# Altium PCB XCZU15EG-F V1.0尺寸图.PcbDoc (part 1 of 2)
Units mil, origin at the board's own origin, x right, y up, seen from the top; angles counter-clockwise.
Board outline 7030 x 5980 mil, 2 copper layers (TOP, BOT), stack 10.74 mil thick; 40 components, 760 nets, 1412 pads, 0 vias.
Unrouted connection lines stored in the file: 737.
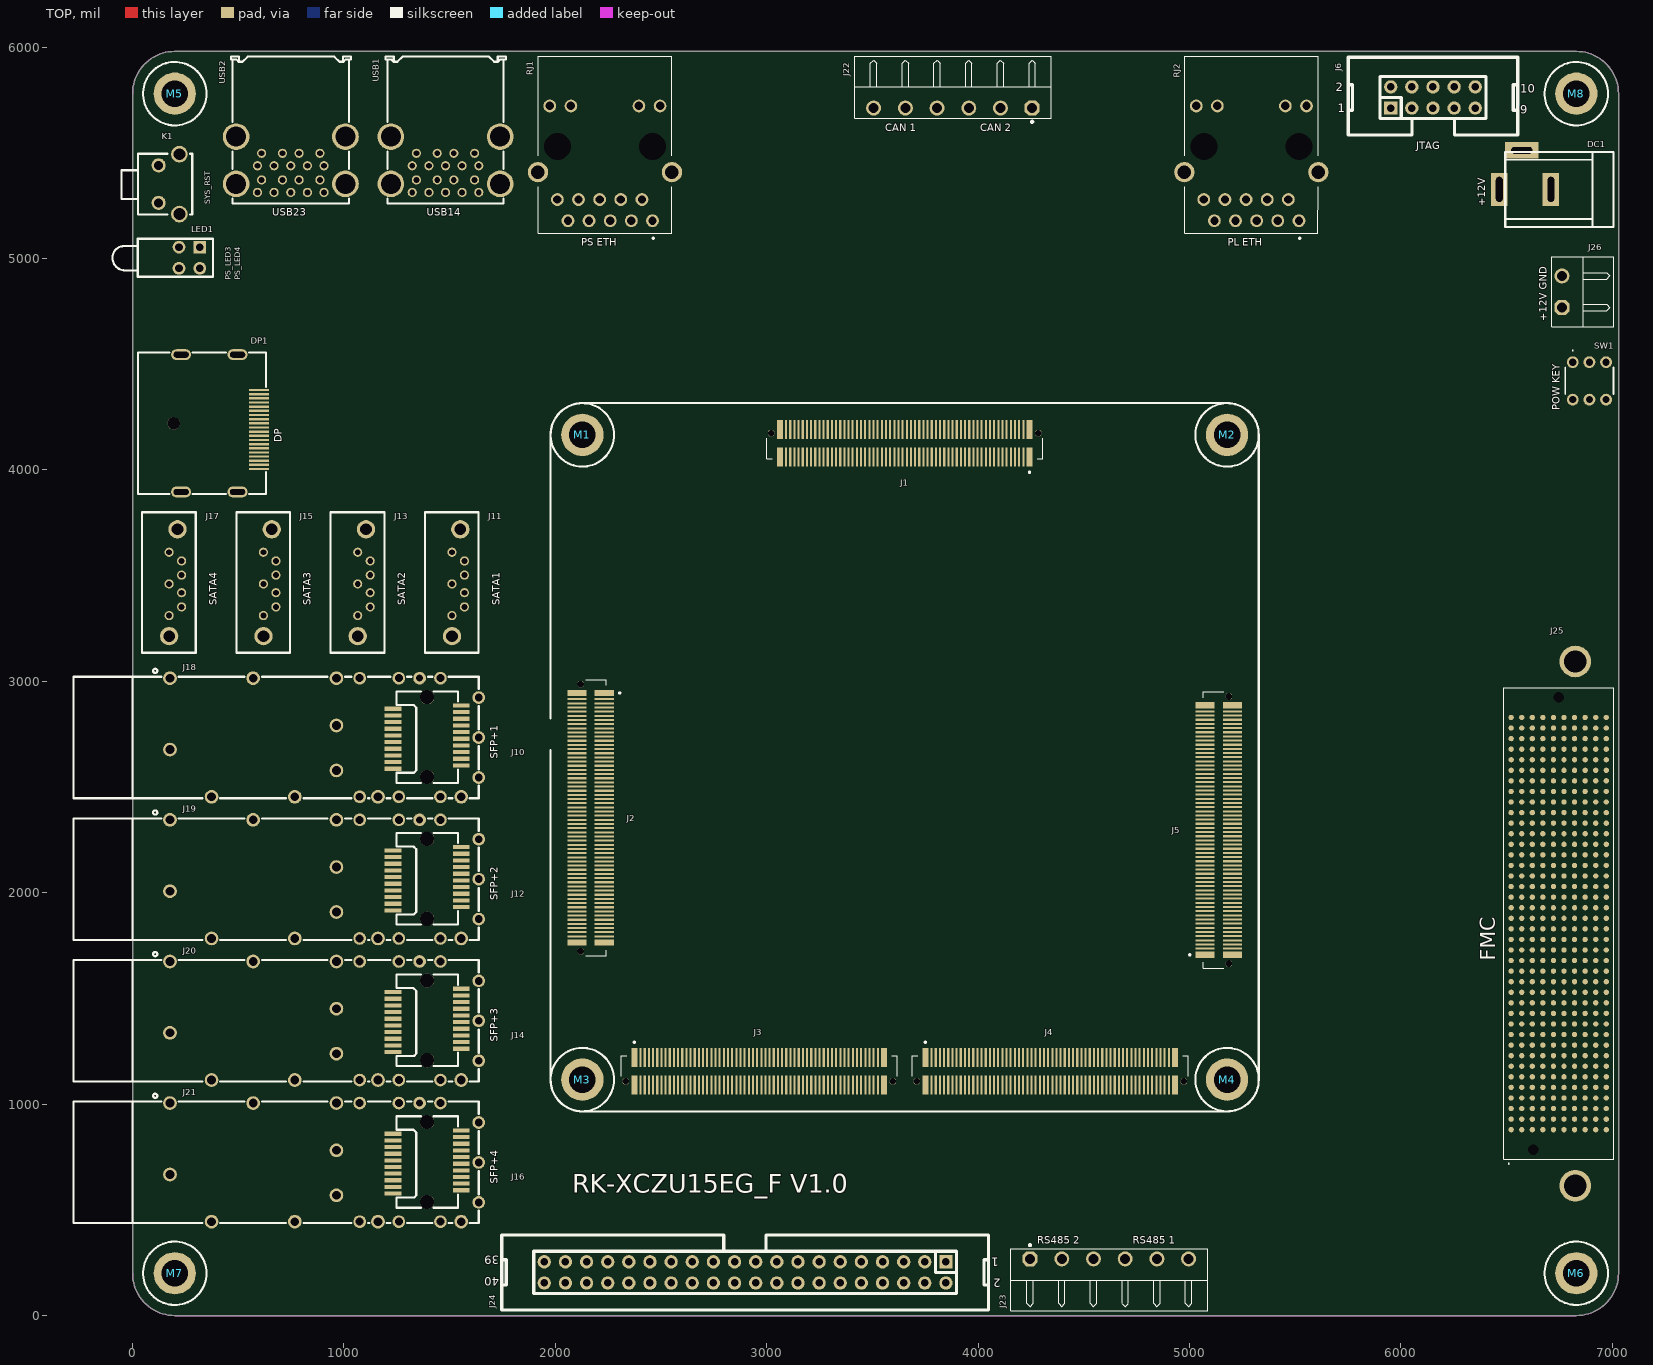
[diagram p0: TOP view]
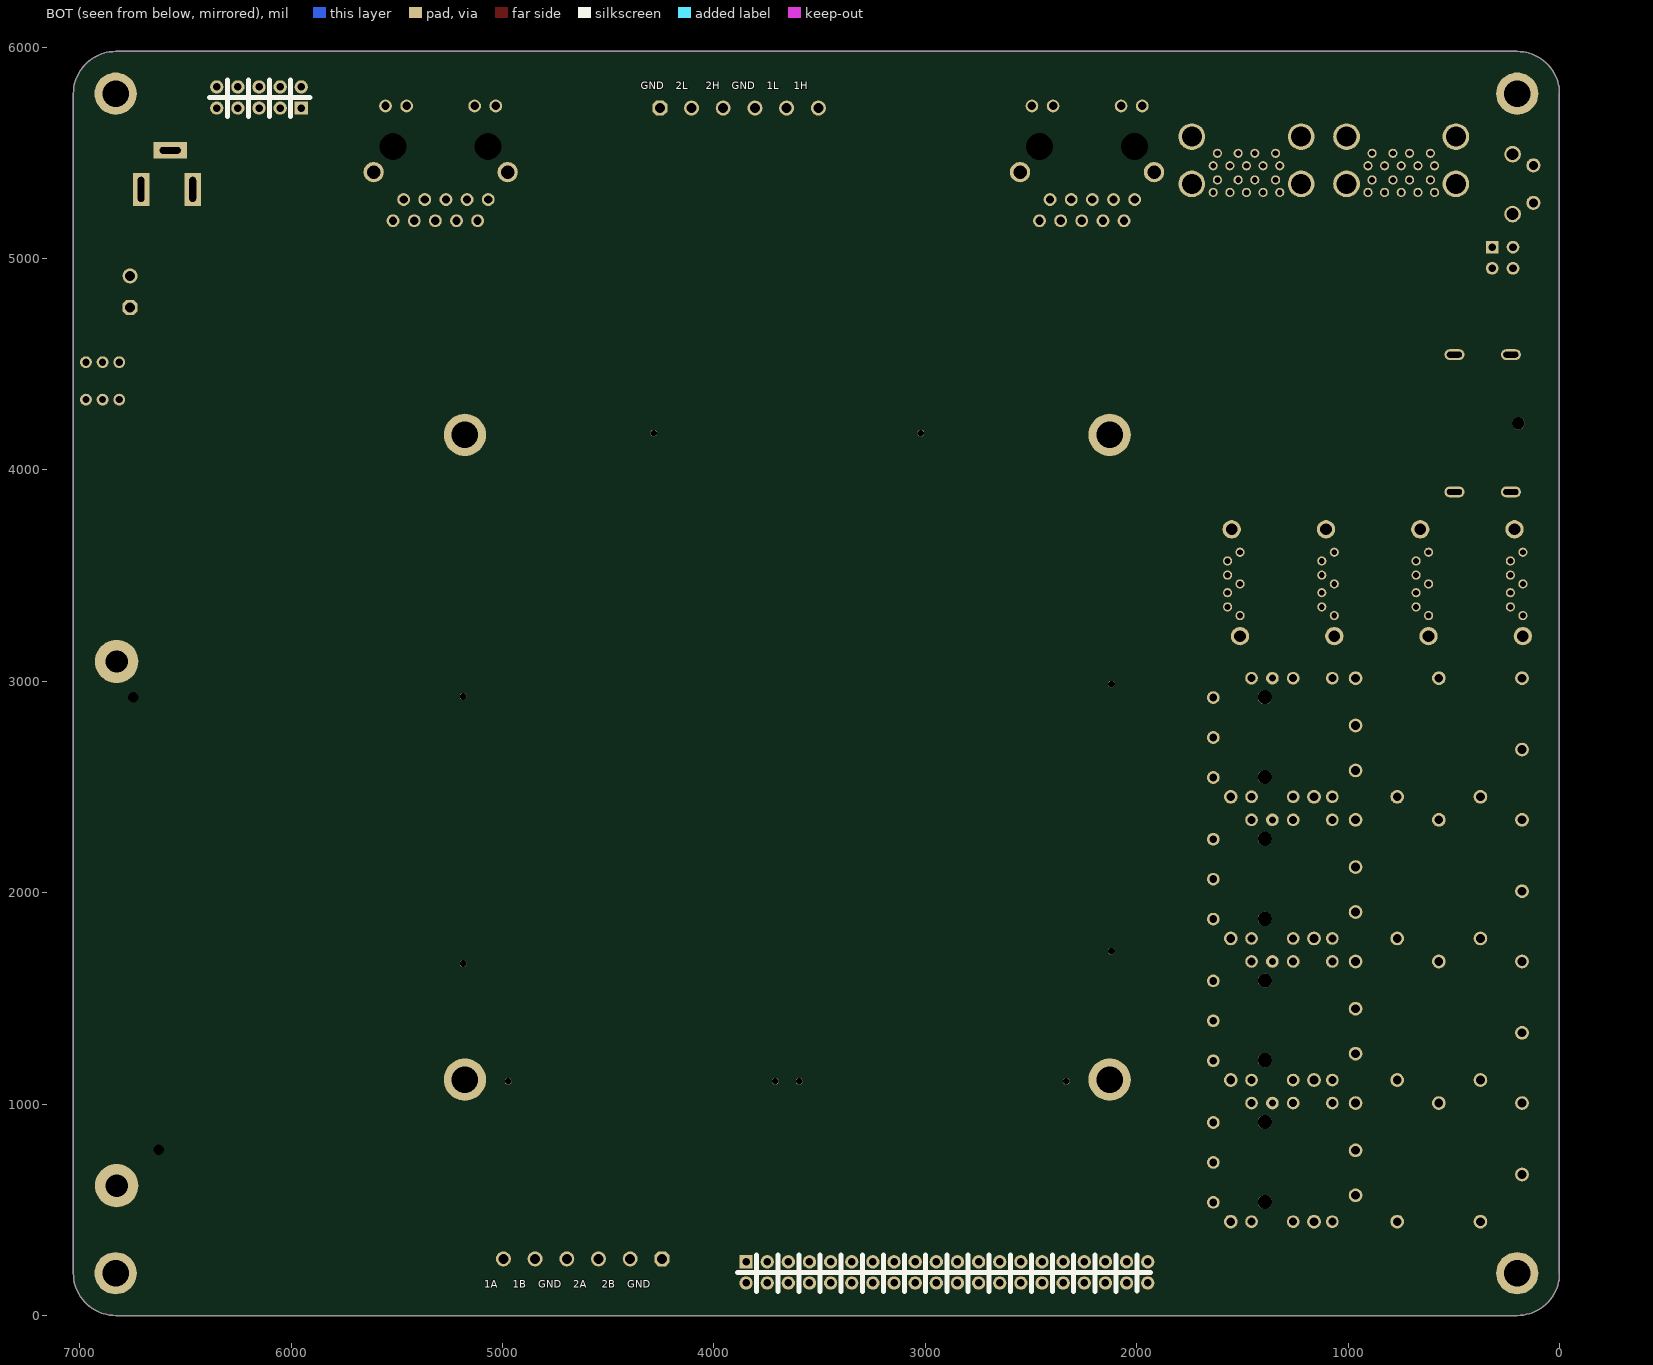
[diagram p1: BOT view, seen from below]

## Layer stack, top to bottom
TOP: signal copper 1.38
Dielectric 2: core 7.98, Dk 4.2
BOT: signal copper 1.38

## Board outline
0,200 ccw(c200,200) 200,0 6830,0 ccw(c6830,200) 7030,200 7030,5780 ccw(c6830,5780) 6830,5980 200,5980 ccw(c200,5780) 0,5780

## Design rules (kind name [scope] priority, off if disabled: settings)
Clearance [All] p1: gap=4 ignorepadtopadclearanceinfootprint=FALSE except(5: Via-Via; 6: Via-Fill Via-Poly Via-Region; 8: THPad-THPad THPad-Via THPad-Text THPad-Hole Via-Text Via-Hole Fill-Fill Fill-Poly Fill-Region Fill-Text Fill-Hole Poly-Poly Poly-Region Poly-Text Poly-Hole Region-Region Region-Text Region-Hole Text-Text Text-Hole; 10: SMDPad-Fill SMDPad-Poly SMDPad-Region THPad-Fill THPad-Poly THPad-Region; 20: Arc-Fill Arc-Poly Arc-Region Track-Fill Track-Poly Track-Region)
ComponentClearance [All] p1 off: gap=10 collisioncheckmode=3 verticalgap=10 showdistances=FALSE
DiffPairsRouting 90R [InNetClass('90R')] p1: maxlimit=4 minlimit=4 mostfreqgap=4 toplayer_minwidth=6.71 toplayer_maxwidth=6.71 toplayer_prefwidth=6.71 bottomlayer_minwidth=6.71 bottomlayer_maxwidth=6.71 bottomlayer_prefwidth=6.71 maxuncoupledlength=50000
DiffPairsRouting [All] p2: maxlimit=4 minlimit=4 mostfreqgap=4 toplayer_minwidth=4.57 toplayer_maxwidth=4.57 toplayer_prefwidth=4.57 bottomlayer_minwidth=4.57 bottomlayer_maxwidth=4.57 bottomlayer_prefwidth=4.57 maxuncoupledlength=50000
HoleSize [All] p1: absolutevalues=TRUE maxlimit=200 minlimit=1 maxpercent=80.000 minpercent=20.000
Length "InNet('DQ1') Or InNet('DQ5')" [InNet('DQ1') Or InNet('DQ5')] p1: maxlimit=1833.85 minlimit=0
MatchedLengths [InNetClass('New Class')] p1: tolerance=0.2 checknetsindiffpair=TRUE checkdiffpairvsdiffpair=FALSE checkxsignals=FALSE checkothers=FALSE
MinimumSolderMaskSliver [All] p1 off: minsoldermaskwidth=10
NetAntennae [All] p1: netantennaetolerance=1
ParallelSegment [All] p1: limit=10000 gap=3.5
PlaneConnect [All] p1: planeconnectstyle=Relief reliefexpansion=20 reliefentries=4 reliefconductorwidth=23.62 reliefairgap=10
PolygonConnect [All] p1: thpad.connectstyle=Relief thpad.reliefconductorwidth=15 thpad.reliefentries=4 thpad.polygonreliefangle="90 Angle" thpad.airgapwidth=8 smdpad.connectstyle=Direct smdpad.reliefconductorwidth=15 smdpad.reliefentries=4 smdpad.polygonreliefangle="90 Angle" smdpad.airgapwidth=8 via.connectstyle=Direct via.reliefconductorwidth=15 via.reliefentries=4 via.polygonreliefangle="90 Angle" via.airgapwidth=8
RoutingVias [All] p1: holewidth=8 width=18 viastyle="Through Hole" minholewidth=8 minwidth=18 maxholewidth=10 maxwidth=20
SilkToBoardRegionClearance [All] p1 off:
SilkToSilkClearance [All] p1: silktosilkclearance=4
SilkToSolderMaskClearance [IsPad] p1: minsilkscreentomaskgap=0 clearancetoexposedcopper=TRUE
SolderMaskExpansion [All] p1: expansion=4 istentingtop=FALSE
UnRoutedNet [All] p1: checkbadconnections=TRUE
Width [All] p1: maxlimit=60 minlimit=5 preferedwidth=5
20 further rules are at their usual default settings.

## Classes and differential pairs
component class "PAGE04 XCZU15EG-F-CON3": J5
component class "PAGE03 XCZU15EG-F-CON2": J3 J4
component class "PAGE02 XCZU15EG-F-CON1": J1 J2
component class "PAGE21 XCZU15EG-F-POW": DC1 J26 SW1
component class "PAGE19 XCZU15EG-F-FMC1": J25
component class "PAGE18 XCZU15EG-F-IO": J24
component class "PAGE17 XCZU15EG-F-CAN&RS485": J22 J23
component class "PAGE14 XCZU15EG-F-SFP&SATA": J10 J11 J12 J13 J14 J15 J16 J17 J18 J19 J20 J21
component class "PAGE12 XCZU15EG-F-USBHUB": USB1 USB2
component class "PAGE09 XCZU15EG-F-DP": DP1
component class "PAGE07 XCZU15EG-F-PLETH": RJ2
component class "PAGE06 XCZU15EG-F-PSETH": RJ1
component class "PAGE05 XCZU15EG-F-JTAG": J6 K1 LED1 M3 M4 M5 M6 M7 M8
differential pair PLL_129_CLK0CC: +PLL_129_CLK0CC_P -PLL_129_CLK0CC_N
differential pair PLL_129_CLK1: +PLL_129_CLK1_P -PLL_129_CLK1_N
differential pair PLL_129_CLK1CC: +PLL_129_CLK1CC_P -PLL_129_CLK1CC_N
differential pair IO17: +IO17_P -IO17_N
differential pair IO16: +IO16_P -IO16_N
differential pair IO15: +IO15_P -IO15_N
differential pair IO14: +IO14_P -IO14_N
differential pair IO13: +IO13_P -IO13_N
differential pair IO12: +IO12_P -IO12_N
differential pair IO11: +IO11_P -IO11_N
differential pair IO10: +IO10_P -IO10_N
differential pair IO9: +IO9_P -IO9_N
differential pair IO8: +IO8_P -IO8_N
differential pair IO7: +IO7_P -IO7_N
differential pair IO6: +IO6_P -IO6_N
differential pair IO5: +IO5_P -IO5_N
differential pair IO4: +IO4_P -IO4_N
differential pair IO3: +IO3_P -IO3_N
differential pair IO2: +IO2_P -IO2_N
differential pair IO1: +IO1_P -IO1_N
differential pair 505_USB_CLKCCCC: +505_USB_CLKCCCC_P -505_USB_CLKCCCC_N
differential pair 129_CLK0: +129_CLK0_P -129_CLK0_N
differential pair FMC_DP5_M2C: +FMC_DP5_M2C_P -FMC_DP5_M2C_N
differential pair FMC_DP4_M2C: +FMC_DP4_M2C_P -FMC_DP4_M2C_N
differential pair FMC_GBTCLK1_M2C: +FMC_GBTCLK1_M2C_P -FMC_GBTCLK1_M2C_N
differential pair FMC_DP7_M2C: +FMC_DP7_M2C_P -FMC_DP7_M2C_N
differential pair FMC_DP7_C2M: +FMC_DP7_C2M_P -FMC_DP7_C2M_N
differential pair FMC_DP6_M2C: +FMC_DP6_M2C_P -FMC_DP6_M2C_N
differential pair FMC_DP6_C2M: +FMC_DP6_C2M_P -FMC_DP6_C2M_N
differential pair FMC_DP5_C2M: +FMC_DP5_C2M_P -FMC_DP5_C2M_N
differential pair FMC_DP4_C2M: +FMC_DP4_C2M_P -FMC_DP4_C2M_N
differential pair PLL_B67_L13: +PLL_B67_L13_P -PLL_B67_L13_N
differential pair PLL_B67_L13CC: +PLL_B67_L13CC_P -PLL_B67_L13CC_N
differential pair FMC_LA13: +FMC_LA13_P -FMC_LA13_N
differential pair 505_DP_CLKCC: +505_DP_CLKCC_P -505_DP_CLKCC_N
differential pair SATA4_TX: +SATA4_TX_P -SATA4_TX_N
differential pair SATA4_RX: +SATA4_RX_P -SATA4_RX_N
differential pair SATA3_TX: +SATA3_TX_P -SATA3_TX_N
differential pair SATA3_RX: +SATA3_RX_P -SATA3_RX_N
differential pair SATA2_TX: +SATA2_TX_P -SATA2_TX_N
differential pair SATA2_RX: +SATA2_RX_P -SATA2_RX_N
differential pair SATA1_TX: +SATA1_TX_P -SATA1_TX_N
differential pair SATA1_RX: +SATA1_RX_P -SATA1_RX_N
differential pair PLL_229_CLK1CC: +PLL_229_CLK1CC_P -PLL_229_CLK1CC_N
differential pair PLL_228_CLK1CC: +PLL_228_CLK1CC_P -PLL_228_CLK1CC_N
differential pair PLL_128_CLK0CC: +PLL_128_CLK0CC_P -PLL_128_CLK0CC_N
differential pair PCIE_REFCLKCC: +PCIE_REFCLKCC_P -PCIE_REFCLKCC_N
differential pair 505_USB_CLKCC: +505_USB_CLKCC_P -505_USB_CLKCC_N
differential pair 505_PCIE_REFCLKCC: +505_PCIE_REFCLKCC_P -505_PCIE_REFCLKCC_N
differential pair PLL_229_CLK1: +PLL_229_CLK1_P -PLL_229_CLK1_N
differential pair PLL_228_CLK1: +PLL_228_CLK1_P -PLL_228_CLK1_N
differential pair PLL_128_CLK0: +PLL_128_CLK0_P -PLL_128_CLK0_N
differential pair 505_USB_CLK: +505_USB_CLK_P -505_USB_CLK_N
differential pair 505_PCIE_REFCLK: +505_PCIE_REFCLK_P -505_PCIE_REFCLK_N
differential pair 505_DP_CLK: +505_DP_CLK_P -505_DP_CLK_N
differential pair FMC_LA33: +FMC_LA33_P -FMC_LA33_N
differential pair FMC_LA32: +FMC_LA32_P -FMC_LA32_N
differential pair FMC_LA31: +FMC_LA31_P -FMC_LA31_N
differential pair FMC_LA30: +FMC_LA30_P -FMC_LA30_N
differential pair FMC_LA29: +FMC_LA29_P -FMC_LA29_N
differential pair FMC_LA28: +FMC_LA28_P -FMC_LA28_N
differential pair FMC_LA27: +FMC_LA27_P -FMC_LA27_N
differential pair FMC_LA26: +FMC_LA26_P -FMC_LA26_N
differential pair FMC_LA25: +FMC_LA25_P -FMC_LA25_N
differential pair FMC_LA24: +FMC_LA24_P -FMC_LA24_N
differential pair FMC_LA23: +FMC_LA23_P -FMC_LA23_N
differential pair FMC_LA22: +FMC_LA22_P -FMC_LA22_N
differential pair FMC_LA21: +FMC_LA21_P -FMC_LA21_N
differential pair FMC_LA20: +FMC_LA20_P -FMC_LA20_N
differential pair FMC_LA19: +FMC_LA19_P -FMC_LA19_N
differential pair FMC_LA18_CC: +FMC_LA18_CC_P -FMC_LA18_CC_N
differential pair FMC_LA17_CC: +FMC_LA17_CC_P -FMC_LA17_CC_N
differential pair FMC_LA16: +FMC_LA16_P -FMC_LA16_N
differential pair FMC_LA15: +FMC_LA15_P -FMC_LA15_N
differential pair FMC_LA14: +FMC_LA14_P -FMC_LA14_N
differential pair FMC_LA12: +FMC_LA12_P -FMC_LA12_N
differential pair FMC_LA11: +FMC_LA11_P -FMC_LA11_N
differential pair FMC_LA10: +FMC_LA10_P -FMC_LA10_N
differential pair FMC_LA09: +FMC_LA09_P -FMC_LA09_N
differential pair FMC_LA08: +FMC_LA08_P -FMC_LA08_N
differential pair FMC_LA07: +FMC_LA07_P -FMC_LA07_N
differential pair FMC_LA06: +FMC_LA06_P -FMC_LA06_N
differential pair FMC_LA05: +FMC_LA05_P -FMC_LA05_N
differential pair FMC_LA04: +FMC_LA04_P -FMC_LA04_N
differential pair FMC_LA03: +FMC_LA03_P -FMC_LA03_N
differential pair FMC_LA02: +FMC_LA02_P -FMC_LA02_N
differential pair FMC_LA01_CC: +FMC_LA01_CC_P -FMC_LA01_CC_N
differential pair FMC_LA00_CC: +FMC_LA00_CC_P -FMC_LA00_CC_N
differential pair FMC_CLK1: +FMC_CLK1_P -FMC_CLK1_N
differential pair FMC_CLK0: +FMC_CLK0_P -FMC_CLK0_N
differential pair FMC_GBTCLK0_M2C: +FMC_GBTCLK0_M2C_P -FMC_GBTCLK0_M2C_N
differential pair FMC_DP0_M2C: +FMC_DP0_M2C_P -FMC_DP0_M2C_N
differential pair FMC_DP0_C2M: +FMC_DP0_C2M_P -FMC_DP0_C2M_N
differential pair FMC_DP3_M2C: +FMC_DP3_M2C_P -FMC_DP3_M2C_N
differential pair FMC_DP3_C2M: +FMC_DP3_C2M_P -FMC_DP3_C2M_N
differential pair FMC_DP2_M2C: +FMC_DP2_M2C_P -FMC_DP2_M2C_N
differential pair FMC_DP2_C2M: +FMC_DP2_C2M_P -FMC_DP2_C2M_N
differential pair FMC_DP1_M2C: +FMC_DP1_M2C_P -FMC_DP1_M2C_N
differential pair FMC_DP1_C2M: +FMC_DP1_C2M_P -FMC_DP1_C2M_N
differential pair SFP2_TX: +SFP2_TX_P -SFP2_TX_N
differential pair SFP2_RX: +SFP2_RX_P -SFP2_RX_N
differential pair SFP1_TX: +SFP1_TX_P -SFP1_TX_N
differential pair SFP1_RX: +SFP1_RX_P -SFP1_RX_N
differential pair SFP4_RX: +SFP4_RX_P -SFP4_RX_N
differential pair SFP4_TX: +SFP4_TX_P -SFP4_TX_N
differential pair PHY2_MDI3: +PHY2_MDI3_P -PHY2_MDI3_N
differential pair PHY2_MDI2: +PHY2_MDI2_P -PHY2_MDI2_N
differential pair PHY2_MDI1: +PHY2_MDI1_P -PHY2_MDI1_N
differential pair PHY2_MDI0: +PHY2_MDI0_P -PHY2_MDI0_N
differential pair PHY1_MDI3: +PHY1_MDI3_P -PHY1_MDI3_N
differential pair PHY1_MDI2: +PHY1_MDI2_P -PHY1_MDI2_N
differential pair PHY1_MDI1: +PHY1_MDI1_P -PHY1_MDI1_N
differential pair PHY1_MDI0: +PHY1_MDI0_P -PHY1_MDI0_N
differential pair USB_TX: +USB_TX_P -USB_TX_N
differential pair USB_RX: +USB_RX_P -USB_RX_N
differential pair SFP3_TX: +SFP3_TX_P -SFP3_TX_N
differential pair SFP3_RX: +SFP3_RX_P -SFP3_RX_N
differential pair PCIE_TX: +PCIE_TX_P -PCIE_TX_N
differential pair MIPI1_LAN1: +MIPI1_LAN1_P -MIPI1_LAN1_N
differential pair MIPI1_LAN0: +MIPI1_LAN0_P -MIPI1_LAN0_N
differential pair MIPI1_CLK: +MIPI1_CLK_P -MIPI1_CLK_N
differential pair GT1_DP_TX: +GT1_DP_TX_P -GT1_DP_TX_N
differential pair GT0_DP_TX: +GT0_DP_TX_P -GT0_DP_TX_N
differential pair DPAUX: +DPAUX_P -DPAUX_N
differential pair SATA4_TX_C: +SATA4_TX_C_P -SATA4_TX_C_N
differential pair SATA4_RX_C: +SATA4_RX_C_P -SATA4_RX_C_N
differential pair SATA3_TX_C: +SATA3_TX_C_P -SATA3_TX_C_N
differential pair SATA3_RX_C: +SATA3_RX_C_P -SATA3_RX_C_N
differential pair PCIE_RX_C: +PCIE_RX_C_P -PCIE_RX_C_N
differential pair TX_DS4_C: +TX_DS4_C_P -TX_DS4_C_N
differential pair PCIE_TX_C: +PCIE_TX_C_P -PCIE_TX_C_N
differential pair USB_4: +USB_4_P -USB_4_N
differential pair USB_3: +USB_3_P -USB_3_N
differential pair USB_2: +USB_2_P -USB_2_N
differential pair USB_1: +USB_1_P -USB_1_N
differential pair TX_DS3_C: +TX_DS3_C_P -TX_DS3_C_N
differential pair TX_DS2_C: +TX_DS2_C_P -TX_DS2_C_N
differential pair TX_DS1_C: +TX_DS1_C_P -TX_DS1_C_N
differential pair SATA2_TX_C: +SATA2_TX_C_P -SATA2_TX_C_N
differential pair SATA2_RX_C: +SATA2_RX_C_P -SATA2_RX_C_N
differential pair SATA1_TX_C: +SATA1_TX_C_P -SATA1_TX_C_N
differential pair SATA1_RX_C: +SATA1_RX_C_P -SATA1_RX_C_N
differential pair GT1_DP_TX_C: +GT1_DP_TX_C_P -GT1_DP_TX_C_N
differential pair GT0_DP_TX_C: +GT0_DP_TX_C_P -GT0_DP_TX_C_N
differential pair DPAUX_C: +DPAUX_C_P -DPAUX_C_N
differential pair USB_TXUP: +USB_TXUP_P -USB_TXUP_N
differential pair USB_RXUP: +USB_RXUP_P -USB_RXUP_N
differential pair TX_DS4: +TX_DS4_P -TX_DS4_N
differential pair TX_DS3: +TX_DS3_P -TX_DS3_N
differential pair TX_DS2: +TX_DS2_P -TX_DS2_N
differential pair TX_DS1: +TX_DS1_P -TX_DS1_N
differential pair RX_DS4: +RX_DS4_P -RX_DS4_N
differential pair RX_DS3: +RX_DS3_P -RX_DS3_N
differential pair RX_DS2: +RX_DS2_P -RX_DS2_N
differential pair RX_DS1: +RX_DS1_P -RX_DS1_N
differential pair PCIE_REFCLK: +PCIE_REFCLK_P -PCIE_REFCLK_N
differential pair D01: +D01_P -D01_N

## Components (designator, comment, footprint, x,y, rotation, side; value= is the part's Value field where it differs from the comment)
DC1 "DC-005-5A-2.5" DC-005 6709.8,5326.96 r0 top locked
DP1 "HYC16-DP20-178" DP-SMD_HYC16-DP20-178 414.64,4220.8 r270 top locked
J1 "AXK6A2337YG" AXK6A2337YG 3653,4127.04 r180 top locked
J2 "AXK6A2337YG" AXK6A2337YG 2166.96,2354.72 r270 top locked
J3 "AXK6A2337YG" AXK6A2337YG 2964.72,1154.96 r0 top locked
J4 "AXK6A2337YG" AXK6A2337YG 4341.28,1154.96 r0 top locked
J5 "AXK6A2337YG" AXK6A2337YG 5139.04,2296.72 r90 top locked
J6 "Pin HDR2X5" IDC2.54-LI-2x5P 5952,5712 r0 top locked
J10 "1367073-1" SFP-SMD_1367073-1 1393.69,2736.26 r270 top locked
J11 "Pin HDR1X9" CONN-TH_LE18077-Z54D-4H 1540.86,3466.61 r270 top locked
J12 "1367073-1" SFP-SMD_1367073-1 1393.69,2066.26 r270 top locked
J13 "Pin HDR1X9" CONN-TH_LE18077-Z54D-4H 1094.86,3466.61 r270 top locked
J14 "1367073-1" SFP-SMD_1367073-1 1393.69,1396.26 r270 top locked
J15 "Pin HDR1X9" CONN-TH_LE18077-Z54D-4H 648.86,3466.61 r270 top locked
J16 "1367073-1" SFP-SMD_1367073-1 1393.69,726.26 r270 top locked
J17 "Pin HDR1X9" CONN-TH_LE18077-Z54D-4H 202.86,3466.61 r270 top locked
J18 "HC-SFP-01L" TH_HC-SFP-01L 907.46,2734.51 r0 top locked
J19 "HC-SFP-01L" TH_HC-SFP-01L 907.46,2064.51 r0 top locked
J20 "HC-SFP-01L" TH_HC-SFP-01L 907.46,1394.51 r0 top locked
J21 "HC-SFP-01L" TH_HC-SFP-01L 907.46,724.51 r0 top locked
J22 "KF2EDGR-Y-3.81-6P-1G" ECH381R-06P 3881,5712 r180 top locked
J23 "KF2EDGR-Y-3.81-6P-1G" ECH381R-06P 4621,268.07 r0 top locked
J24 "Pin HDR2X20" IDC2.54-LI-2x20P 3848,254 r180 top locked
J25 "ASP_134486_01" ASP13448601 6746.8,1842.59 r270 top locked
J26 "KF2EDGR-Y-3.81-2P-1G" ECH381R-02P 6762,4843 r90 top locked
K1 "1825027-5" KEY-TH_4P-L7.5-W6.8-P4.50-LS7.2 172.79,5352.27 r270 top locked
LED1 "MHK2396EGBTD" LED-TH_4P-L11.8-W4.3-P2.54 269.22,5004 r270 top locked
M1 "Test" M3x4_L 2128,4166 r0 top
M2 "Test" M3x4_L 5178,4166 r0 top
M3 "Test" M3x4_L 2128,1116 r0 top locked
M4 "Test" M3x4_L 5178,1116 r0 top locked
M5 "Test" M3x4_L 200,5780 r0 top locked
M6 "Test" M3x4_L 6830,200 r0 top locked
M7 "Test" M3x4_L 200,200 r0 top locked
M8 "Test" M3x4_L 6830,5780 r0 top locked
RJ1 "HR911130A" HR911130A 2234.83,5525.31 r0 top locked
RJ2 "HR911130A" HR911130A 5292.83,5525.31 r0 top locked
SW1 "XKB5858-Z" XKB5858Z 6813.26,4510 r180 top locked
USB1 "USB-303WSD-BRY" USB-A-TH_XUNPU_USB-303WSD-BRY 1480.67,5444.85 r180 top locked
USB2 "USB-303WSD-BRY" USB-A-TH_XUNPU_USB-303WSD-BRY 748.67,5444.85 r180 top locked

## Footprints (in the part's own frame and the unit in brackets; to place one, negate y for a bottom-side part, rotate by r counter-clockwise, add the part's x,y. Pads: shape width x height; smd on the part's side, far side on the other; paste and mask are expansions set on the pad)
ASP13448601 [mm]
  round 0.64 smd: A1(24.47,-5.715) A2(23.2,-5.715) A3(21.93,-5.715) A4(20.66,-5.715) A5(19.39,-5.715) A6(18.12,-5.715) A7(16.85,-5.715) A8(15.58,-5.715) A9(14.31,-5.715) A10(13.04,-5.715) A11(11.77,-5.715) A12(10.5,-5.715) A13(9.23,-5.715) A14(7.96,-5.715) A15(6.69,-5.715) A16(5.42,-5.715) A17(4.15,-5.715) A18(2.88,-5.715) A19(1.61,-5.715) A20(0.34,-5.715) A21(-0.93,-5.715) A22(-2.2,-5.715) A23(-3.47,-5.715) A24(-4.74,-5.715) A25(-6.01,-5.715) A26(-7.28,-5.715) A27(-8.55,-5.715) A28(-9.82,-5.715) A29(-11.09,-5.715) A30(-12.36,-5.715) A31(-13.63,-5.715) A32(-14.9,-5.715) A33(-16.17,-5.715) A34(-17.44,-5.715) A35(-18.71,-5.715) A36(-19.98,-5.715) A37(-21.25,-5.715) A38(-22.52,-5.715) A39(-23.79,-5.715) A40(-25.06,-5.715) B1(24.47,-4.445) B2(23.2,-4.445) B3(21.93,-4.445) B4(20.66,-4.445) B5(19.39,-4.445) B6(18.12,-4.445) B7(16.85,-4.445) B8(15.58,-4.445) B9(14.31,-4.445) B10(13.04,-4.445) B11(11.77,-4.445) B12(10.5,-4.445) B13(9.23,-4.445) B14(7.96,-4.445) B15(6.69,-4.445) B16(5.42,-4.445) B17(4.15,-4.445) B18(2.88,-4.445) B19(1.61,-4.445) B20(0.34,-4.445) B21(-0.93,-4.445) B22(-2.2,-4.445) B23(-3.47,-4.445) B24(-4.74,-4.445) B25(-6.01,-4.445) B26(-7.28,-4.445) B27(-8.55,-4.445) B28(-9.82,-4.445) B29(-11.09,-4.445) B30(-12.36,-4.445) B31(-13.63,-4.445) B32(-14.9,-4.445) B33(-16.17,-4.445) B34(-17.44,-4.445) B35(-18.71,-4.445) B36(-19.98,-4.445) B37(-21.25,-4.445) B38(-22.52,-4.445) B39(-23.79,-4.445) B40(-25.06,-4.445) C1(24.47,-3.175) C2(23.2,-3.175) C3(21.93,-3.175) C4(20.66,-3.175) C5(19.39,-3.175) C6(18.12,-3.175) C7(16.85,-3.175) C8(15.58,-3.175) C9(14.31,-3.175) C10(13.04,-3.175) C11(11.77,-3.175) C12(10.5,-3.175) C13(9.23,-3.175) C14(7.96,-3.175) C15(6.69,-3.175) C16(5.42,-3.175) C17(4.15,-3.175) C18(2.88,-3.175) C19(1.61,-3.175) C20(0.34,-3.175) C21(-0.93,-3.175) C22(-2.2,-3.175) C23(-3.47,-3.175) C24(-4.74,-3.175) C25(-6.01,-3.175) C26(-7.28,-3.175) C27(-8.55,-3.175) C28(-9.82,-3.175) C29(-11.09,-3.175) C30(-12.36,-3.175) C31(-13.63,-3.175) C32(-14.9,-3.175) C33(-16.17,-3.175) C34(-17.44,-3.175) C35(-18.71,-3.175) C36(-19.98,-3.175) C37(-21.25,-3.175) C38(-22.52,-3.175) C39(-23.79,-3.175) C40(-25.06,-3.175) D1(24.47,-1.905) D2(23.2,-1.905) D3(21.93,-1.905) D4(20.66,-1.905) D5(19.39,-1.905) D6(18.12,-1.905) D7(16.85,-1.905) D8(15.58,-1.905) D9(14.31,-1.905) D10(13.04,-1.905) D11(11.77,-1.905) D12(10.5,-1.905) D13(9.23,-1.905) D14(7.96,-1.905) D15(6.69,-1.905) D16(5.42,-1.905) D17(4.15,-1.905) D18(2.88,-1.905) D19(1.61,-1.905) D20(0.34,-1.905) D21(-0.93,-1.905) D22(-2.2,-1.905) D23(-3.47,-1.905) D24(-4.74,-1.905) D25(-6.01,-1.905) D26(-7.28,-1.905) D27(-8.55,-1.905) D28(-9.82,-1.905) D29(-11.09,-1.905) D30(-12.36,-1.905) D31(-13.63,-1.905) D32(-14.9,-1.905) D33(-16.17,-1.905) D34(-17.44,-1.905) D35(-18.71,-1.905) D36(-19.98,-1.905) D37(-21.25,-1.905) D38(-22.52,-1.905) D39(-23.79,-1.905) D40(-25.06,-1.905) E1(24.47,-0.635) E2(23.2,-0.635) E3(21.93,-0.635) E4(20.66,-0.635) E5(19.39,-0.635) E6(18.12,-0.635) E7(16.85,-0.635) E8(15.58,-0.635) E9(14.31,-0.635) E10(13.04,-0.635) E11(11.77,-0.635) E12(10.5,-0.635) E13(9.23,-0.635) E14(7.96,-0.635) E15(6.69,-0.635) E16(5.42,-0.635) E17(4.15,-0.635) E18(2.88,-0.635) E19(1.61,-0.635) E20(0.34,-0.635) E21(-0.93,-0.635) E22(-2.2,-0.635) E23(-3.47,-0.635) E24(-4.74,-0.635) E25(-6.01,-0.635) E26(-7.28,-0.635) E27(-8.55,-0.635) E28(-9.82,-0.635) E29(-11.09,-0.635) E30(-12.36,-0.635) E31(-13.63,-0.635) E32(-14.9,-0.635) E33(-16.17,-0.635) E34(-17.44,-0.635) E35(-18.71,-0.635) E36(-19.98,-0.635) E37(-21.25,-0.635) E38(-22.52,-0.635) E39(-23.79,-0.635) E40(-25.06,-0.635) F1(24.47,0.635) F2(23.2,0.635) F3(21.93,0.635) F4(20.66,0.635) F5(19.39,0.635) F6(18.12,0.635) F7(16.85,0.635) F8(15.58,0.635) F9(14.31,0.635) F10(13.04,0.635) F11(11.77,0.635) F12(10.5,0.635) F13(9.23,0.635) F14(7.96,0.635) F15(6.69,0.635) F16(5.42,0.635) F17(4.15,0.635) F18(2.88,0.635) F19(1.61,0.635) F20(0.34,0.635) F21(-0.93,0.635) F22(-2.2,0.635) F23(-3.47,0.635) F24(-4.74,0.635) F25(-6.01,0.635) F26(-7.28,0.635) F27(-8.55,0.635) F28(-9.82,0.635) F29(-11.09,0.635) F30(-12.36,0.635) F31(-13.63,0.635) F32(-14.9,0.635) F33(-16.17,0.635) F34(-17.44,0.635) F35(-18.71,0.635) F36(-19.98,0.635) F37(-21.25,0.635) F38(-22.52,0.635) F39(-23.79,0.635) F40(-25.06,0.635) G1(24.47,1.905) G2(23.2,1.905) G3(21.93,1.905) G4(20.66,1.905) G5(19.39,1.905) G6(18.12,1.905) G7(16.85,1.905) G8(15.58,1.905) G9(14.31,1.905) G10(13.04,1.905) G11(11.77,1.905) G12(10.5,1.905) G13(9.23,1.905) G14(7.96,1.905) G15(6.69,1.905) G16(5.42,1.905) G17(4.15,1.905) G18(2.88,1.905) G19(1.61,1.905) G20(0.34,1.905) G21(-0.93,1.905) G22(-2.2,1.905) G23(-3.47,1.905) G24(-4.74,1.905) G25(-6.01,1.905) G26(-7.28,1.905) G27(-8.55,1.905) G28(-9.82,1.905) G29(-11.09,1.905) G30(-12.36,1.905) G31(-13.63,1.905) G32(-14.9,1.905) G33(-16.17,1.905) G34(-17.44,1.905) G35(-18.71,1.905) G36(-19.98,1.905) G37(-21.25,1.905) G38(-22.52,1.905) G39(-23.79,1.905) G40(-25.06,1.905) H1(24.47,3.175) H2(23.2,3.175) H3(21.93,3.175) H4(20.66,3.175) H5(19.39,3.175) H6(18.12,3.175) H7(16.85,3.175) H8(15.58,3.175) H9(14.31,3.175) H10(13.04,3.175) H11(11.77,3.175) H12(10.5,3.175) H13(9.23,3.175) H14(7.96,3.175) H15(6.69,3.175) H16(5.42,3.175) H17(4.15,3.175) H18(2.88,3.175) H19(1.61,3.175) H20(0.34,3.175) H21(-0.93,3.175) H22(-2.2,3.175) H23(-3.47,3.175) H24(-4.74,3.175) H25(-6.01,3.175) H26(-7.28,3.175) H27(-8.55,3.175) H28(-9.82,3.175) H29(-11.09,3.175) H30(-12.36,3.175) H31(-13.63,3.175) H32(-14.9,3.175) H33(-16.17,3.175) H34(-17.44,3.175) H35(-18.71,3.175) H36(-19.98,3.175) H37(-21.25,3.175) H38(-22.52,3.175) H39(-23.79,3.175) H40(-25.06,3.175) J1(24.47,4.445) J2(23.2,4.445) J3(21.93,4.445) J4(20.66,4.445) J5(19.39,4.445) J6(18.12,4.445) J7(16.85,4.445) J8(15.58,4.445) J9(14.31,4.445) J10(13.04,4.445) J11(11.77,4.445) J12(10.5,4.445) J13(9.23,4.445) J14(7.96,4.445) J15(6.69,4.445) J16(5.42,4.445) J17(4.15,4.445) J18(2.88,4.445) J19(1.61,4.445) J20(0.34,4.445) J21(-0.93,4.445) J22(-2.2,4.445) J23(-3.47,4.445) J24(-4.74,4.445) J25(-6.01,4.445) J26(-7.28,4.445) J27(-8.55,4.445) J28(-9.82,4.445) J29(-11.09,4.445) J30(-12.36,4.445) J31(-13.63,4.445) J32(-14.9,4.445) J33(-16.17,4.445) J34(-17.44,4.445) J35(-18.71,4.445) J36(-19.98,4.445) J37(-21.25,4.445) J38(-22.52,4.445) J39(-23.79,4.445) J40(-25.06,4.445) K1(24.47,5.715) K2(23.2,5.715) K3(21.93,5.715) K4(20.66,5.715) K5(19.39,5.715) K6(18.12,5.715) K7(16.85,5.715) K8(15.58,5.715) K9(14.31,5.715) K10(13.04,5.715) K11(11.77,5.715) K12(10.5,5.715) K13(9.23,5.715) K14(7.96,5.715) K15(6.69,5.715) K16(5.42,5.715) K17(4.15,5.715) K18(2.88,5.715) K19(1.61,5.715) K20(0.34,5.715) K21(-0.93,5.715) K22(-2.2,5.715) K23(-3.47,5.715) K24(-4.74,5.715) K25(-6.01,5.715) K26(-7.28,5.715) K27(-8.55,5.715) K28(-9.82,5.715) K29(-11.09,5.715) K30(-12.36,5.715) K31(-13.63,5.715) K32(-14.9,5.715) K33(-16.17,5.715) K34(-17.44,5.715) K35(-18.71,5.715) K36(-19.98,5.715) K37(-21.25,5.715) K38(-22.52,5.715) K39(-23.79,5.715) K40(-25.06,5.715)
  round 0.635 hole 1.27 unplated: MH1(26.895,-3.05) MH2(-27.485,0)
  round 3.81 / inner round 3.302 / far side round 5.2 hole 2.692: S1(-31.786,2.002) S2(31.196,2.002)
  silkscreen extent -28.6,-6.62 28.6,6.62, body extent -29.02,-6.62 28.44,6.62, height 5.75
AXK6A2337YG [mm]
  rect 0.75x2.3 smd paste-2: 1(-15,1.65) 2(-15,-1.65) 119(15,1.65) 120(15,-1.65)
  rect 0.25x2.3 smd paste-2: 3(-14.25,1.65) 4(-14.25,-1.65) 5(-13.75,1.65) 6(-13.75,-1.65) 7(-13.25,1.65) 8(-13.25,-1.65) 9(-12.75,1.65) 10(-12.75,-1.65) 11(-12.25,1.65) 12(-12.25,-1.65) 13(-11.75,1.65) 14(-11.75,-1.65) 15(-11.25,1.65) 16(-11.25,-1.65) 17(-10.75,1.65) 18(-10.75,-1.65) 19(-10.25,1.65) 20(-10.25,-1.65) 21(-9.75,1.65) 22(-9.75,-1.65) 23(-9.25,1.65) 24(-9.25,-1.65) 25(-8.75,1.65) 26(-8.75,-1.65) 27(-8.25,1.65) 28(-8.25,-1.65) 29(-7.75,1.65) 30(-7.75,-1.65) 31(-7.25,1.65) 32(-7.25,-1.65) 33(-6.75,1.65) 34(-6.75,-1.65) 35(-6.25,1.65) 36(-6.25,-1.65) 37(-5.75,1.65) 38(-5.75,-1.65) 39(-5.25,1.65) 40(-5.25,-1.65) 41(-4.75,1.65) 42(-4.75,-1.65) 43(-4.25,1.65) 44(-4.25,-1.65) 45(-3.75,1.65) 46(-3.75,-1.65) 47(-3.25,1.65) 48(-3.25,-1.65) 49(-2.75,1.65) 50(-2.75,-1.65) 51(-2.25,1.65) 52(-2.25,-1.65) 53(-1.75,1.65) 54(-1.75,-1.65) 55(-1.25,1.65) 56(-1.25,-1.65) 57(-0.75,1.65) 58(-0.75,-1.65) 59(-0.25,1.65) 60(-0.25,-1.65) 61(0.25,1.65) 62(0.25,-1.65) 63(0.75,1.65) 64(0.75,-1.65) 65(1.25,1.65) 66(1.25,-1.65) 67(1.75,1.65) 68(1.75,-1.65) 69(2.25,1.65) 70(2.25,-1.65) 71(2.75,1.65) 72(2.75,-1.65) 73(3.25,1.65) 74(3.25,-1.65) 75(3.75,1.65) 76(3.75,-1.65) 77(4.25,1.65) 78(4.25,-1.65) 79(4.75,1.65) 80(4.75,-1.65) 81(5.25,1.65) 82(5.25,-1.65) 83(5.75,1.65) 84(5.75,-1.65) 85(6.25,1.65) 86(6.25,-1.65) 87(6.75,1.65) 88(6.75,-1.65) 89(7.25,1.65) 90(7.25,-1.65) 91(7.75,1.65) 92(7.75,-1.65) 93(8.25,1.65) 94(8.25,-1.65) 95(8.75,1.65) 96(8.75,-1.65) 97(9.25,1.65) 98(9.25,-1.65) 99(9.75,1.65) 100(9.75,-1.65) 101(10.25,1.65) 102(10.25,-1.65) 103(10.75,1.65) 104(10.75,-1.65) 105(11.25,1.65) 106(11.25,-1.65) 107(11.75,1.65) 108(11.75,-1.65) 109(12.25,1.65) 110(12.25,-1.65) 111(12.75,1.65) 112(12.75,-1.65) 113(13.25,1.65) 114(13.25,-1.65) 115(13.75,1.65) 116(13.75,-1.65) 117(14.25,1.65) 118(14.25,-1.65)
  round 0.81 hole 0.81 unplated: ""(-16.05,-1.2) ""(16.05,-1.2)
  silkscreen extent -16.6,-0.6 16.6,3.6, body extent -16.6,-2.3 16.6,2.3, height 2.4
CONN-TH_LE18077-Z54D-4H [mm]
  round 1.1 hole 0.7 paste+0 mask+0.05: 1(3.955,-0.75) 2(2.9,0.75) 3(1.2,0.75) 4(0.145,-0.75) 5(-0.91,0.75) 6(-2.61,0.75) 7(-3.665,-0.75)
  round 2.2 hole 1.4 paste+0 mask+0.05: 8(-6.415,0.25) 9(6.415,-0.75)
  silkscreen extent -8.46,-4 8.42,2.45
DC-005 [mm] "5.5*2.1mm，DC30V,2.5A"
  rect 2x4 hole 0.8 slot 3 at 90 deg: 1(-6.2,0) 2(0,0)
  rect 4x2 hole 0.8 slot 2.5 at 0 deg: 3(-3.5,4.7)
  silkscreen extent -5.48,-4.5 7.5,4.5, body extent -6.55,-4.5 7.5,4.8, height 11.2
DP-SMD_HYC16-DP20-178 [mm]
  round 1.5 hole 1.5 unplated: 0(0,-5.59)
  rect 0.28x2.4 smd paste-100 mask+0.051: 1(5.5,4.69) 2(5,4.69) 3(4.5,4.69) 4(4,4.69) 5(3.5,4.69) 6(3,4.69) 7(2.5,4.69) 8(2,4.69) 9(1.5,4.69) 10(1,4.69) 11(0.5,4.69) 12(0,4.69) 13(-0.5,4.69) 14(-1,4.69) 15(-1.5,4.69) 16(-2,4.69) 17(-2.5,4.69) 18(-3,4.69) 19(-3.5,4.69) 20(-4,4.69)
  oval 1.3x2.4 hole 0.7 slot 1.8 at 90 deg paste+0 mask+0.051: 21(-8.25,2.09) 22(-8.25,-4.69) 23(8.25,-4.69) 24(8.25,2.09)
  silkscreen extent -8.5,-9.87 8.5,5.5
ECH381R-02P [mm] "Connector; Header; 2 Position; Right Angle"
  oct 1.8x1.8 hole 1.2: 1(-1.905,0)
  round 1.8 hole 1.2: 2(1.905,0)
  silkscreen extent -4.21,-6.25 4.21,1.2, body extent -4.21,-17.15 4.2,1.2, height 7.42
ECH381R-06P [mm] "Connector; Header; 6 Position; Right Angle"
  oct 1.8x1.8 hole 1.2: 1(-9.525,0)
  round 1.8 hole 1.2: 2(-5.715,0) 3(-1.905,0) 4(1.905,0) 5(5.715,0) 6(9.525,0)
  silkscreen extent -11.83,-6.25 11.83,1.77, body extent -11.82,-17.15 11.83,1.2, height 7.42
HR911130A [mm]
  round 1.54 hole 0.99: 1(5.715,-8.794) 2(4.445,-6.254) 3(3.175,-8.794) 4(1.905,-6.254) 5(0.635,-8.794) 6(-0.635,-6.254) 7(-1.905,-8.794) 8(-3.175,-6.254) 9(-4.445,-8.794) 10(-5.715,-6.254)
  round 1.53 hole 1.02: 11(6.625,4.996) 12(4.085,4.996) 13(-4.085,4.996) 14(-6.625,4.996)
  round 2.445 hole 1.63: 15(-8.05,-2.954) 16(8.05,-2.954)
  round 1.625 hole 3.25 unplated: 17(-5.715,0.096) 18(5.715,0.096)
  silkscreen extent -8.02,-11 8.05,11, body extent -7.94,-10.4 7.94,11, height 13.45
IDC2.54-LI-2x5P [mm] "10P简易牛角座"
  rect 1.6x1.6 hole 0.9: 1(0,0)
  round 1.6 hole 0.9: 2(0,2.54) 3(2.54,0) 4(2.54,2.54) 5(5.08,0) 6(5.08,2.54) 7(7.62,0) 8(7.62,2.54) 9(10.16,0) 10(10.16,2.54)
  silkscreen extent -5.11,-3.23 15.27,6.1, body extent -5.08,-3.08 15.24,5.77, height 9.17
IDC2.54-LI-2x20P [mm] "40P简易牛角座"
  rect 1.6x1.6 hole 0.9: 1(0,0)
  round 1.6 hole 0.9: 2(0,2.54) 3(2.54,0) 4(2.54,2.54) 5(5.08,0) 6(5.08,2.54) 7(7.62,0) 8(7.62,2.54) 9(10.16,0) 10(10.16,2.54) 11(12.7,0) 12(12.7,2.54) 13(15.24,0) 14(15.24,2.54) 15(17.78,0) 16(17.78,2.54) 17(20.32,0) 18(20.32,2.54) 19(22.86,0) 20(22.86,2.54) 21(25.4,0) 22(25.4,2.54) 23(27.94,0) 24(27.94,2.54) 25(30.48,0) 26(30.48,2.54) 27(33.02,0) 28(33.02,2.54) 29(35.56,0) 30(35.56,2.54) 31(38.1,0) 32(38.1,2.54) 33(40.64,0) 34(40.64,2.54) 35(43.18,0) 36(43.18,2.54) 37(45.72,0) 38(45.72,2.54) 39(48.26,0) 40(48.26,2.54)
  silkscreen extent -5.11,-3.23 53.37,5.77, body extent -5.08,-3.08 53.34,5.77, height 9.17
KEY-TH_4P-L7.5-W6.8-P4.50-LS7.2 [mm]
  round 1.7 hole 1.1: 1(-2.25,-1.25) 2(2.25,-1.25)
  round 2 hole 1.4: 3(3.6,1.25) 4(-3.6,1.25)
  silkscreen extent -3.65,-5.71 3.65,2.79
LED-TH_4P-L11.8-W4.3-P2.54 [mil]
  rect 60x60 hole 36 paste+0 mask+1.97: 1(-50,49.22)
  round 60 hole 36 paste+0 mask+1.97: 2(50,49.22) 3(50,-49.22) 4(-50,-49.22)
  silkscreen extent -90,-364 90,111
M3x4_L [mil] "M3铜柱，长：4mm"
  round 200 hole 125: 1(0,0)
  silkscreen extent -150,-150 150,150, body extent -106,-93 106,93, height 159
SFP-SMD_1367073-1 [mm]
  rect 0.5x2 smd paste+0 mask+0.051: 1(-3.4,-4.1) 2(-2.6,-4.1) 3(-1.8,-4.1) 4(-1,-4.1) 5(-0.2,-4.1) 6(0.6,-4.1) 7(1.4,-4.1) 8(2.2,-4.1) 9(3,-4.1) 10(3.8,-4.1) 11(3.4,4.1) 12(2.6,4.1) 13(1.8,4.1) 14(1,4.1) 15(0.2,4.1) 16(-0.6,4.1) 17(-1.4,4.1) 18(-2.2,4.1) 19(-3,4.1) 20(-3.8,4.1)
  round 1.7 hole 1.7 unplated: ""(-4.799,0) ""(4.799,0)
  silkscreen extent -5.5,-3.7 5.5,3.7, body extent -5.5,-4.5 5.5,4.5, height 5.1
TH_HC-SFP-01L [mm]
  round 1.65 hole 1.05 paste+0 mask+0.05: 1(-18.55,7.125) 2(-8.55,7.125) 3(1.45,7.125) 11(16.45,-7.125) 14(6.45,-7.125) 16(-3.55,-7.125) 17(-13.55,-7.125) 18(-18.55,-1.455) 19(1.45,-3.955) 20(1.45,1.445)
  round 1.524 hole 0.95 paste+0 mask+0.05: 4(4.25,7.125) 5(8.95,7.125) 7(13.95,7.125) 8(18.55,4.795) 9(18.55,-0.005) 10(18.55,-4.805) 12(13.95,-7.125) 13(8.95,-7.125) 15(4.25,-7.125)
  round 1.524 hole 0.85 paste+0 mask+0.05: 6(11.45,7.125)
  silkscreen extent -30.15,-7.3 18.55,8.25, body extent -30.06,-7.8 18.75,7.8, height 10.15
USB-A-TH_XUNPU_USB-303WSD-BRY [mm]
  round 1.1 hole 0.7 paste+0 mask+0.05: 1(-3.5,-1.35) 2(-1,-1.35) 3(1,-1.35) 4(3.5,-1.35) 5(4,0.15) 6(2,0.15) 7(0,0.15) 8(-2,0.15) 9(-4,0.15) 10(-3.5,1.85) 11(-1,1.85) 12(1,1.85) 13(3.5,1.85) 14(4,3.35) 15(2,3.35) 16(0,3.35) 17(-2,3.35) 18(-4,3.35)
  round 3.2 hole 2.4 paste+0 mask+0.05: 19(6.57,-3.35) 20(6.57,2.33) 21(-6.57,2.33) 22(-6.57,-3.35)
  silkscreen extent -7.26,-12.97 7.19,4.7
XKB5858Z [mm]
  round 1.414 hole 0.87: 1(0,0) 2(-2,0) 3(-4,0) 4(0,4.5) 5(-4,4.5) 6(-2,4.5)
  silkscreen extent -4.9,-1.45 0.9,3.85